# Altium PCB BYTE_Rib.PcbDoc
Units mm, origin at the board's own origin, x right, y up, seen from the top; angles counter-clockwise.
Board outline 38.01 x 73.01 mm, 2 copper layers (Top Layer, Bottom Layer); 29 components, 17 nets, 110 pads, 93 vias.
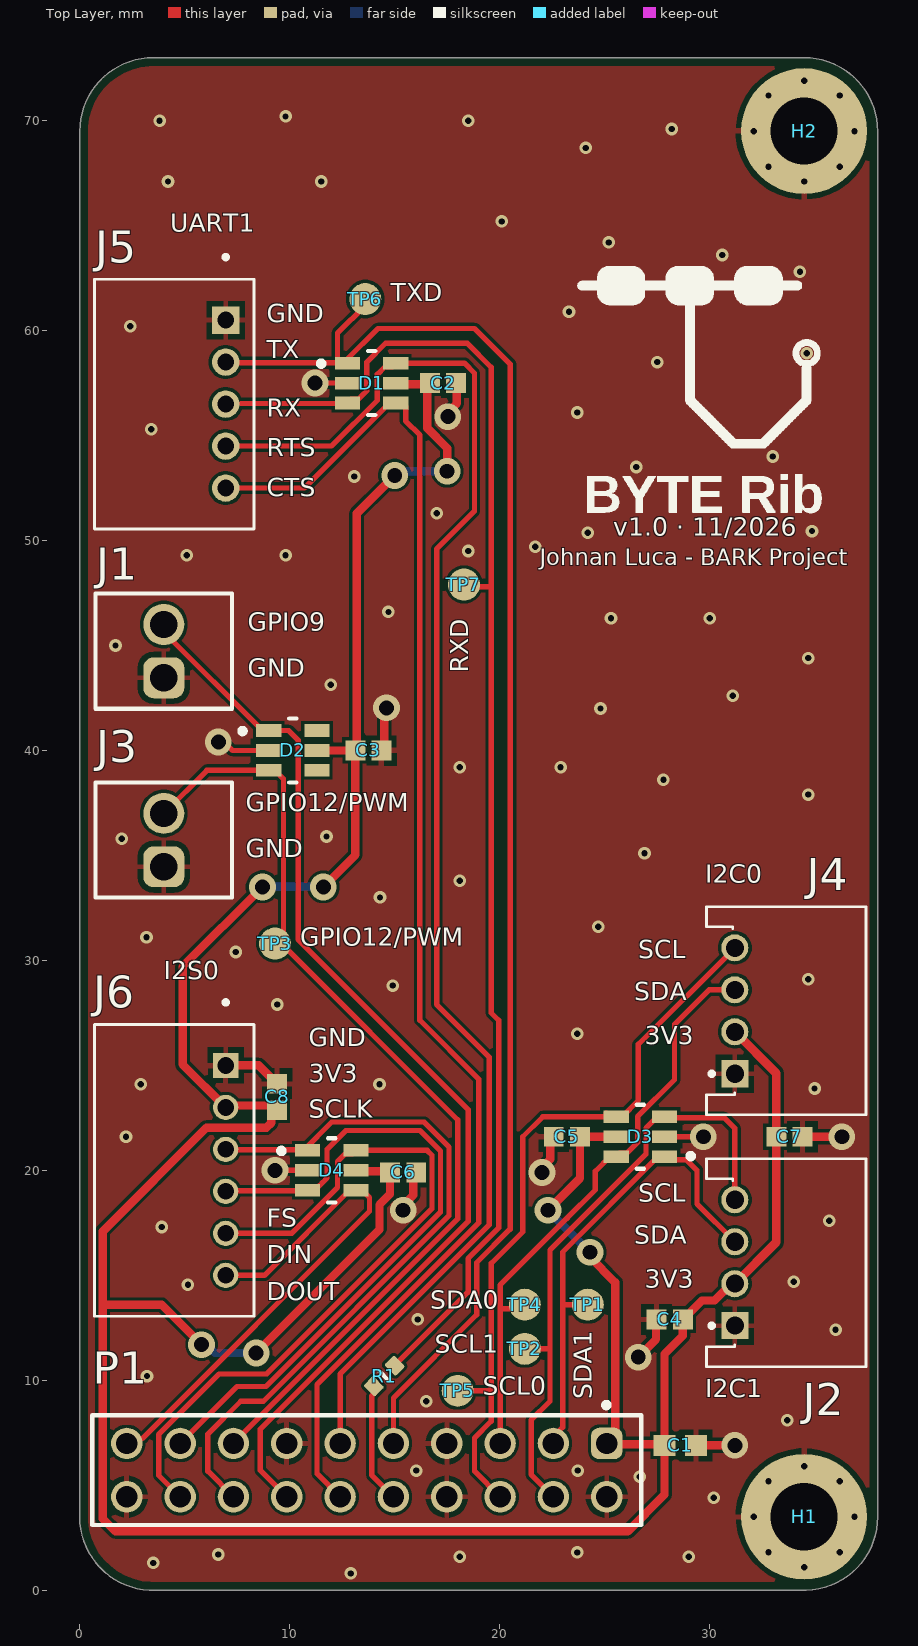
[diagram p0: Top Layer view]
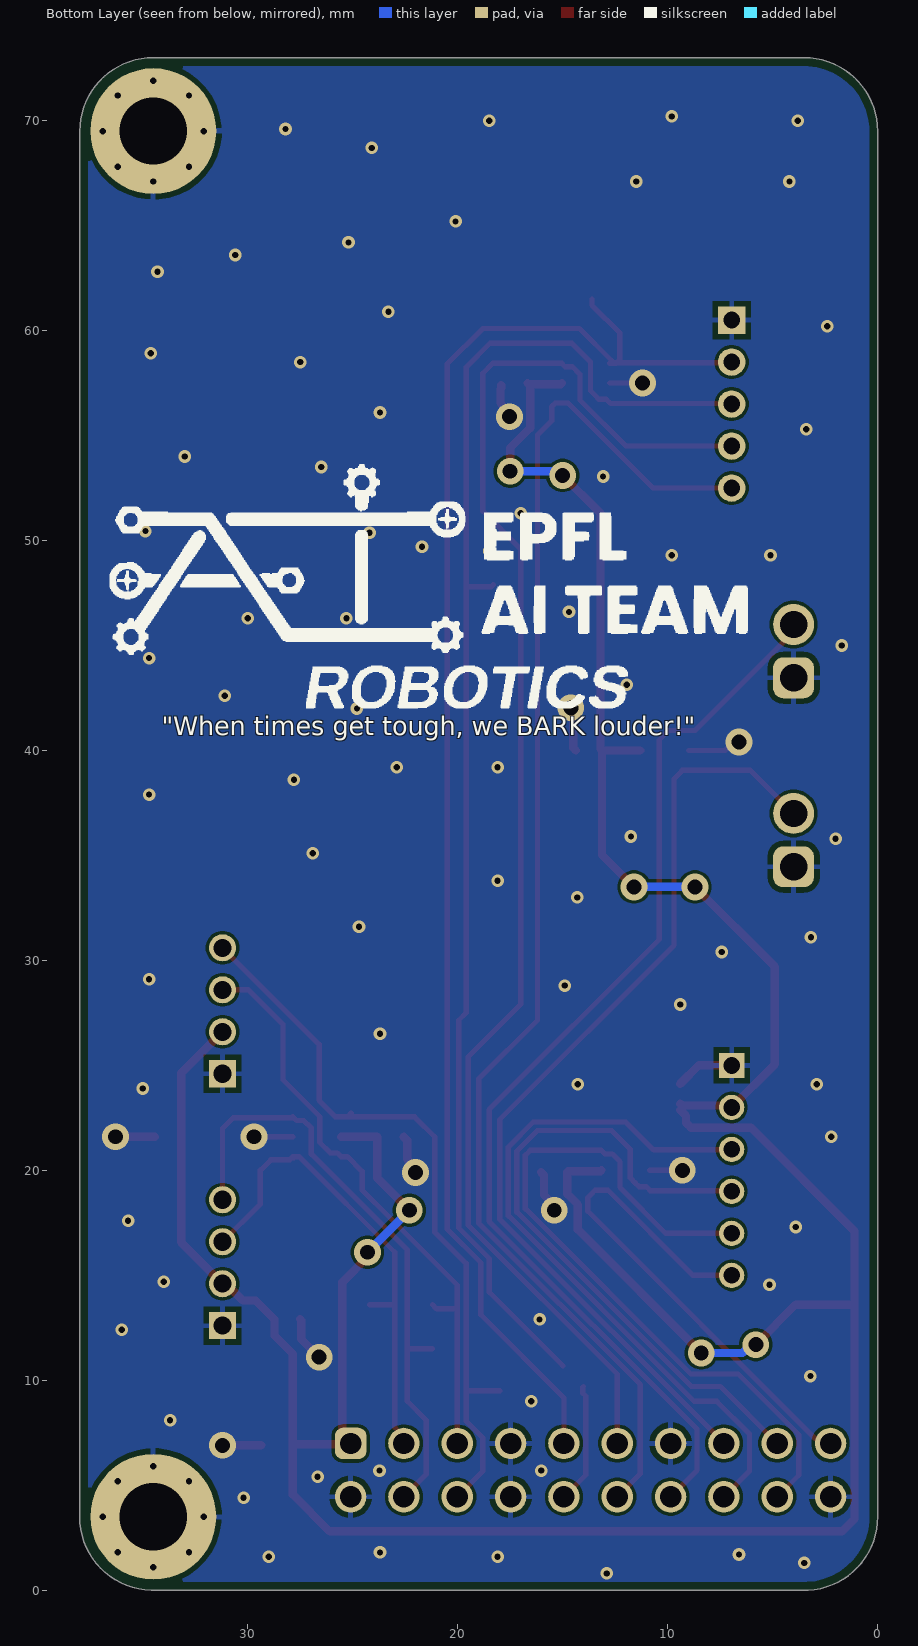
[diagram p1: Bottom Layer view, seen from below]
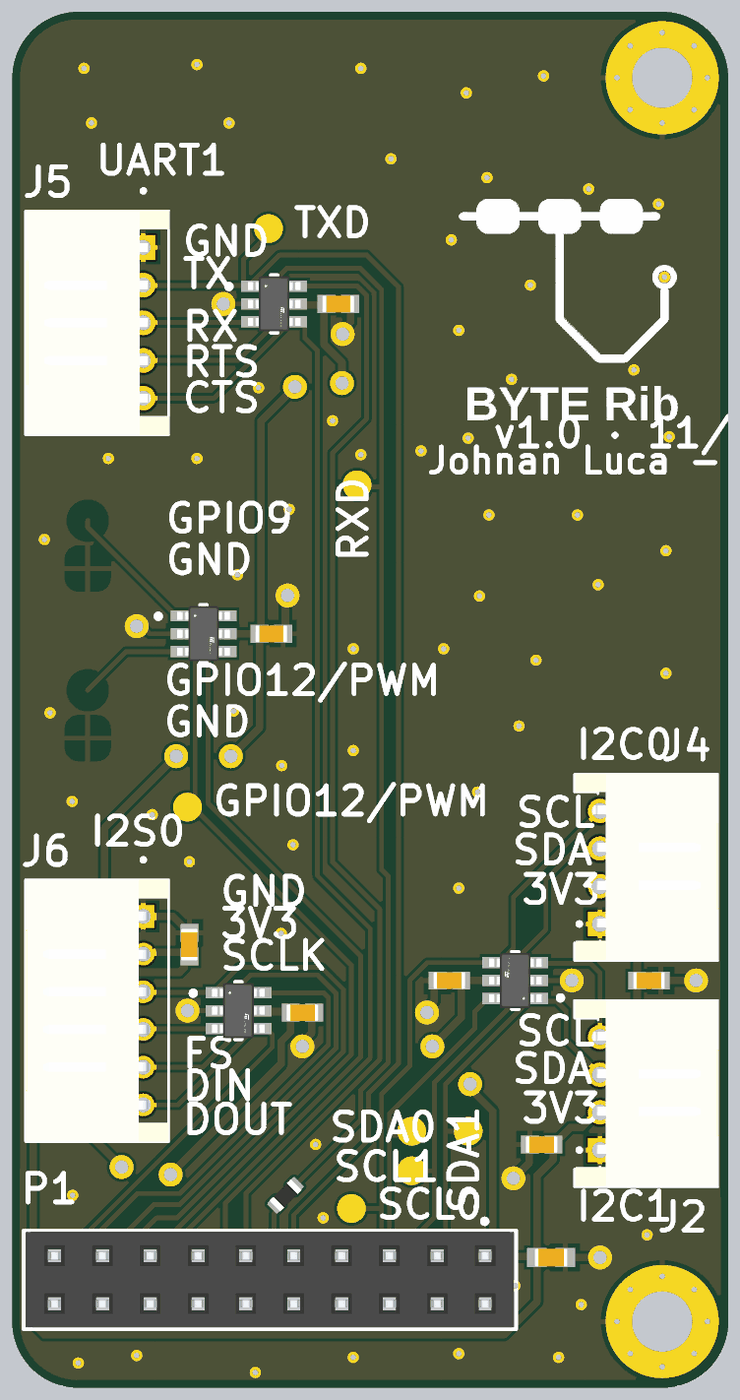
[diagram p2: 3D render of the assembled board from above, using the file's embedded part models]

## Layer stack, top to bottom
Top Solder: solder mask 0.0102, Solder Resist, Dk 3.5
Top Layer: signal copper 0.0356
Dielectric 1: dielectric 0.32, FR-4, Dk 4.8
Bottom Layer: signal copper 0.0356
Bottom Solder: solder mask 0.0102, Solder Resist, Dk 3.5

## Board outline
-0.007,3.5 -0.007,69.493 0,69.5 cw(c3.5,69.5) 3.5,73 34.5,73 cw(c34.5,69.5) 38,69.5 38,3.507 38.007,3.5 cw(c34.5,3.5) 34.6,-0.006 3.602,-0.006 cw(c3.5,3.5)

## Design rules (kind name [scope] priority, off if disabled: settings)
BoardOutlineClearance [All] p1: gap=0.4 ignorepadtopadclearanceinfootprint=FALSE
Clearance [All] p1: gap=0.15 ignorepadtopadclearanceinfootprint=FALSE
PolygonConnect [All] p1: thpad.connectstyle=Relief thpad.reliefconductorwidth=0.254 thpad.reliefentries=4 thpad.polygonreliefangle="90 Angle" thpad.airgapwidth=0.254 smdpad.connectstyle=Relief smdpad.reliefconductorwidth=0.254 smdpad.reliefentries=4 smdpad.polygonreliefangle="90 Angle" smdpad.airgapwidth=0.254 via.connectstyle=Direct via.reliefconductorwidth=0.254 via.reliefentries=4 via.polygonreliefangle="90 Angle" via.airgapwidth=0.254
RoutingVias [All] p1: holewidth=0.8 width=1.27 viastyle="Through Hole" minholewidth=0.3 minwidth=0.6 maxholewidth=0.711 maxwidth=1.3
SolderMaskExpansion [All] p1: expansion=0 istentingtop=FALSE
SupplyNets "Schematic Supply Nets" [InNet('GND')] p1: voltage=0.000
Width Width_PWR [InNet('3V3_Jetson')] p1: maxlimit=0.4 minlimit=0.254 preferedwidth=0.4
Width [All] p2: maxlimit=0.4 minlimit=0.15 preferedwidth=0.254
30 further rules are at their usual default settings.

## Components (designator, comment, footprint, x,y, rotation, side; value= is the part's Value field where it differs from the comment)
C1 "2.2uF" CAPC1608X94X35NL15T15 28.6,6.9 r0 top
C2 "Capacitor 100 nF +/-10% 50 V 0603" CAPC1608X90X40NL10T20 17.3,57.5 r0 top value=100nF
C3 "Capacitor 100 nF +/-10% 50 V 0603" CAPC1608X90X40NL10T20 13.75,40 r0 top value=100nF
C4 "Capacitor 100 nF +/-10% 50 V 0603" CAPC1608X90X40NL10T20 28.1,12.9 r180 top value=100nF
C5 "Capacitor 100 nF +/-10% 50 V 0603" CAPC1608X90X40NL10T20 23.2,21.6 r180 top value=100nF
C6 "Capacitor 100 nF +/-10% 50 V 0603" CAPC1608X90X40NL10T20 15.4,19.9 r0 top value=100nF
C7 "Capacitor 100 nF +/-10% 50 V 0603" CAPC1608X90X40NL10T20 33.8,21.6 r0 top value=100nF
C8 "Capacitor 100 nF +/-10% 50 V 0603" CAPC1608X90X40NL10T20 9.4,23.5 r90 top value=100nF
D1 "USBLC6-4SC6" FP-SOT23-6L-MFG 13.9,57.5 r0 top value=3pF
D2 "USBLC6-4SC6" FP-SOT23-6L-MFG 10.15,40 r0 top value=3pF
D3 "USBLC6-4SC6" FP-SOT23-6L-MFG 26.7,21.6 r180 top value=3pF
D4 "USBLC6-4SC6" FP-SOT23-6L-MFG 12,20 r0 top value=3pF
H1 "M3" MH_M3_PTH 34.5,3.5 r0 top locked
H2 "M3" MH_M3_PTH 34.5,69.5 r0 top locked
J1 "691210910002" 691210910002 -1266,1314.73 r90 top
J2 "S4B-PH-K-S(LF)(SN)" JST_S4B-PH-K-S(LF)(SN) 31.2,15.6 r90 top
J3 "691210910002" 691210910002 -1266,1305.73 r90 top
J4 "S4B-PH-K-S(LF)(SN)" JST_S4B-PH-K-S(LF)(SN) 31.2,27.6 r90 top
J5 "S5B-PH-K-S(LF)(SN)" JST_S5B-PH-K-S(LF)(SN) 4.5,56.5 r270 top
J6 "S6B-PH-K-S(LF)(SN)" JST_S6B-PH-K-S(LF)(SN) 4.5,20 r270 top
P1 "61302021821" 61302021821 13.67,5.72 r180 top locked
R1 "1k" RESC0603(1608)_L 14.5,10.2 r225 top
TP1 "TP" TP_SMD_D1.5 24.2,13.6 r0 top
TP2 "TP" TP_SMD_D1.5 21.2,11.5 r90 top
TP3 "TP" TP_SMD_D1.5 9.3,30.8 r90 top
TP4 "TP" TP_SMD_D1.5 21.2,13.6 r90 top
TP5 "TP" TP_SMD_D1.5 18,9.5 r90 top
TP6 "TP" TP_SMD_D1.5 13.6,61.5 r90 top
TP7 "TP" TP_SMD_D1.5 18.3,47.9 r90 top

## Footprints (in the part's own frame and the unit in brackets; to place one, negate y for a bottom-side part, rotate by r counter-clockwise, add the part's x,y. Pads: shape width x height; smd on the part's side, far side on the other; paste and mask are expansions set on the pad)
61302021821 [mm] "Socket Header, Pitch 2.54 mm, THT, Vertical, dual row, 20p"
  rrect50% 1.5x1.5 hole 1.02: 1(-11.43,-1.27)
  round 1.5 hole 1.02: 2(-11.43,1.27) 3(-8.89,-1.27) 4(-8.89,1.27) 5(-6.35,-1.27) 6(-6.35,1.27) 7(-3.81,-1.27) 8(-3.81,1.27) 9(-1.27,-1.27) 10(-1.27,1.27) 11(1.27,-1.27) 12(1.27,1.27) 13(3.81,-1.27) 14(3.81,1.27) 15(6.35,-1.27) 16(6.35,1.27) 17(8.89,-1.27) 18(8.89,1.27) 19(11.43,-1.27) 20(11.43,1.27)
  silkscreen extent -13.08,-3.22 13.08,2.62, body extent -12.95,-2.54 12.95,2.54, height 8.45
691210910002 [mm] "2,54mm - modular - green - Horizontal wire entry - Cage clamp - 0,8mm2 wires - 02p"
  rrect50% 1.95x1.95 hole 1.3: 1(-1271.27,-1270)
  round 1.95 hole 1.3: 2(-1268.73,-1270)
  silkscreen extent -1272.74,-1273.25 -1267.26,-1266.75, body extent -1272.74,-1273.25 -1267.26,-1266.75, height 8.55
CAPC1608X90X40NL10T20 [mm] "Chip Capacitor, 2-Leads, Body 1.70x0.90mm, IPC Medium Density"
  rect 0.95x0.95 smd: 1(-0.625,0) 2(0.625,0)
  body extent -0.85,-0.45 0.85,0.45, height 0.9
CAPC1608X94X35NL15T15 [mm] "Chip Capacitor, 2-Leads, Body 1.75x0.96mm, IPC Medium Density"
  rect 1.05x1 smd: 1(-0.75,0) 2(0.75,0)
  body extent -0.87,-0.48 0.87,0.48, height 0.94
FP-SOT23-6L-MFG [mm]
  rect 1.2x0.6 smd paste+0 mask+0: 1(-1.15,0.95) 2(-1.15,0) 3(-1.15,-0.95) 4(1.15,-0.95) 5(1.15,0) 6(1.15,0.95)
  silkscreen extent -2.52,-1.53 0.18,1.53, body extent -1.85,-1.63 1.85,1.63, height 0.25
JST_S4B-PH-K-S(LF)(SN) [mm]
  rect 1.29x1.29 / inner round 1.29 / far side rect 1.29x1.29 hole 0.86 mask+0.102: 1(-3,0)
  round 1.29 hole 0.86 mask+0.102: 2(-1,0) 3(1,0) 4(3,0)
  silkscreen extent -4.95,-6.25 4.95,1.35, body extent -4.9,-6.3 5,1.3, height 4.8
JST_S5B-PH-K-S(LF)(SN) [mm]
  rect 1.308x1.308 / inner round 1.308 / far side rect 1.308x1.308 hole 0.8 mask+0.102: 1(-4,2.45)
  round 1.308 hole 0.8 mask+0.102: 2(-2,2.45) 3(0,2.45) 4(2,2.45) 5(4,2.45)
  silkscreen extent -7.1,-3.8 5.95,3.8, body extent -5.95,-3.75 5.95,3.85, height 4.8
JST_S6B-PH-K-S(LF)(SN) [mm]
  rect 1.2x1.2 / inner round 1.2 / far side rect 1.2x1.2 hole 0.8 mask+0.102: 1(-5,2.45)
  round 1.2 hole 0.8 mask+0.102: 2(-3,2.45) 3(-1,2.45) 4(1,2.45) 5(3,2.45) 6(5,2.45)
  silkscreen extent -8.1,-3.8 6.95,3.8, body extent -6.95,-3.8 6.95,3.8, height 4.8
MH_M3_PTH [mm]
  round 0.6 hole 0.3: 1(-2.4,0) 1(-1.697,-1.697) 1(-1.697,1.697) 1(0,-2.4) 1(0,2.4) 1(1.697,-1.697) 1(1.697,1.697) 1(2.4,0)
  round 6 hole 3.2: 1(0,0)
RESC0603(1608)_L [mm] "Chip Resistor, Body 1.6x0.8mm, IPC High Density"
  rrect25% 0.66x0.76 smd: 1(-0.7,0) 2(0.7,0)
  silkscreen extent 0,-0.3 0,0.3, body extent -0.8,-0.4 0.8,0.4, height 0.45
TP_SMD_D1.5 [mil]
  round 60 smd paste-99999: 1(0,0)

## Part data
C1: library part CMP-001-00003-6, Capacitor Type=Ceramic, Case/Package=0603, LCSC=C23630, Max Operating Temperature=125°C, Min Operating Temperature=-55°C, Tolerance=10%, Voltage Rating=16V, Mounting Technology=SM, Pins=2, RoHS Compliant=True
C2 C3 C4 C5 C6 C7 C8: library part CMP-001-00017-6, "Chip Capacitor, 100 nF, +/- 10%, 50 V, 0603 (1608 Metric)", Capacitor Type=Ceramic, Case/Package=0603, LCSC=C14663, Max Operating Temperature=125°C, Min Operating Temperature=-55°C, Tolerance=10%, Voltage Rating=50V, Mounting Technology=SM, Pins=2, RoHS Compliant=True
D1 D2 D3 D4: library part CMP-2000-07370-2, "TVS DIODE 5.25V 17V SOT23-6", Breakdown Voltage=6V, Capacitance=3pF, Clamping Voltage=17V, LCSC=C111212, Manufacturer=STMicroelectronics, Max Junction Temp=+125°C, Package=SOT23-6L, Peak Pulse Power=130W, Temperature="-40°C to +125°C", Temperature Range Low=-40°C, Automotive=No, Category=Diode, ComponentLink2Description=Datasheet, ComponentLink2URL=https://upverter.com/datasheet/23dc4ffb028d868909e80577610284b194f13213.pdf, Device Class L1="Circuit Protection", Device Class L2="ESD and Circuit Protection ICs", Device Class L3=unset, Digikey Description="TVS DIODE 5.25V 17V SOT23-6", Direction=Unidirectional, Height=1.45mm, Interface=USB,Ethernet,Other, Lead Free=Yes, Manufacturer Part Number=USBLC6-4SC6, Mouser Description="USBLC6 Series 4 Line 6 V Uni / Bi-Directional ESD Protection - SOT-23-6", Number Of Channels=4, Octopart=https://octopart.com/usblc6-4sc6-stmicroelectronics-347147, RoHS=TRUE, Standoff Height=0mm, Temperature Range High=+125°C
H1 H2: library part MH_M3_PTH
J1 J3: library part CMP-1502-02456-3, "Tb, Wire To Brd, R/A, 2Way, 18Awg Rohs Compliant: Yes", Current Rating=6A, Max Operating Temperature=105°C, Min Operating Temperature=-40°C, Voltage Rating=150V, Contact Material=Tin, Height=8.7mm, Number of Contacts=2, Number of Rows=1, RoHS=Compliant
J2 J4: library part S4B-PH-K-S_(LF)(SN), "Connector Header Through Hole, Right Angle 4 position 0.079 (2.00mm)", Package="NON STANDARD-4 J.S.T.", Check_prices=https://www.snapeda.com/parts/S4B-PH-K-S%20(LF)(SN)/JST/view-part/?ref=eda, MF="JST Sales", MP="S4B-PH-K-S (LF)(SN)", SnapEDA_Link=https://www.snapeda.com/parts/S4B-PH-K-S%20(LF)(SN)/JST/view-part/?ref=snap
J5: "Connector Header Through Hole, Right Angle 5 position 0.079 (2.00mm)", Package="NON STANDARD-5 J.S.T.", Check_prices=https://www.snapeda.com/parts/S5B-PH-K-S(LF)(SN)/JST/view-part/?ref=eda, MF="JST Sales", MP=S5B-PH-K-S(LF)(SN), SnapEDA_Link=https://www.snapeda.com/parts/S5B-PH-K-S(LF)(SN)/JST/view-part/?ref=snap
J6: "Connector Header Through Hole, Right Angle 6 position 0.079 (2.00mm)", Package="NON STANDARD-6 J.S.T.", Check_prices=https://www.snapeda.com/parts/S6B-PH-K-S(LF)(SN)/JST/view-part/?ref=eda, MF="JST Sales", MP=S6B-PH-K-S(LF)(SN), SnapEDA_Link=https://www.snapeda.com/parts/S6B-PH-K-S(LF)(SN)/JST/view-part/?ref=snap
P1: library part CMP-1502-01350-4, "THT Vertical Socket Header WR-PHD, Pitch 2.54 mm, Dual Row, 20 pins", Contact Resistance=20mΩ, Current Rating=3A, Operating Supply Voltage=250V, Gender=Female, Lead Pitch=2.54mm, Number of Pins=20, Orientation=Vertical
R1: library part CMP-009-00175-3, "0603", LCSC=C21190, Max Operating Temperature=155°C, Min Operating Temperature=-55°C, Case/Package=0603, Pins=2
TP1 TP2 TP3 TP4 TP5 TP6 TP7: library part TP_SMD_D1.5

## Via types
v1: diameter 0.6, hole 0.3, Top Layer to Bottom Layer, 74 vias
v2: diameter 1.27, hole 0.711, Top Layer to Bottom Layer, 19 vias

## Nets (pads, with @x,y where several pads share a name; then routed paths per layer and width w, separated by ;. In a path a pad name is that pad's centre, name@x,y a point inside that pad or via, vN(x,y) a via of type N, cw(c..) or ccw(c..) an arc to the next point about the centre after c; other vN are vias at no path point)
3V3_Jetson: C1.1 C2.1 C3.1 C4.1 C5.1 C6.1 C7.1 C8.1 D1.5 D2.5 D3.5 D4.5 J2.2 J4.2 J6.2 P1.1 | length 170.2
  Top Layer w0.4: v2(5.8,11.7) 3.9,13.6 1.1,13.6 ; v2(8.4,11.3) 14.277,17.177 14.277,18.37 14.775,18.868 C6.1 14.725,19.95 13.2,19.95 D4.5 ; v2(8.7,33.5) 4.9,29.7 4.9,25.05 J6.2 7.038,23.088 9.313,23.088 C8.1@9.4,23.175 ; C8.1 9.125,22.6 9.125,22.269 8.891,22.034 6.034,22.034 1.1,17.1 1.1,13.6 ; D2.5 C3.1 ; v2(11.6,33.5) 13.125,35.025 C3.1 ; v2(15,53.1) 13.2,51.3 13.2,40.075 C3.1 ; D1.5 15.1,57.45 C2.1@16.625,57.45 ; C2.1 16.549,57.374 16.549,55.351 17.5,54.4 v2(17.5,53.3) ; v2(22.3,18.1) 23.825,19.625 C5.1 D3.5 ; v2(24.3,16.1) 24.3,15.865 25.5,14.665 25.5,7.39 P1.1 25.145,6.945 27.805,6.945 C1.1 ; J4.2 33.175,24.625 C7.1 33.175,16.575 J2.2 31.035,14.6 30.237,13.802 29.627,13.802 C4.1 28.725,12.125 27.85,11.25 C1.1 ; 1.1,13.6 1.1,3.4 1.7,2.8 26.1,2.8 27.85,4.55 C1.1
  Bottom Layer w0.4: v2(5.8,11.7) 6.035,11.7 6.435,11.3 v2(8.4,11.3) ; v2(8.7,33.5) v2(11.6,33.5) ; v2(15,53.1) 15.2,53.3 v2(17.5,53.3) ; v2(22.3,18.1) v2(24.3,16.1)
GND: C1.2 C2.2 C3.2 C4.2 C5.2 C6.2 C7.2 C8.2 D1.2 D2.2 D3.2 D4.2 H1.1 H2.1 J1.1 J2.1 J3.1 J4.1 J5.1 J6.1 P1.2 P1.7 P1.8 P1.13 P1.20 | length 24
  Top Layer w0.254: v2(6.6,40.4) 6.875,40.4 7.275,40 D2.2 ; v2(9.3,20) D4.2 ; v2(11.2,57.5) D1.2 ; D3.2 v2(29.7,21.6)
  Top Layer w0.4: J6.1 8.525,25 C8.2 ; C3.2 14.492,40.117 14.492,41.912 v2(14.61,42.029) ; v2(15.4,18.1) 15.4,18.335 15.89,18.825 15.89,19.765 C6.2 ; v2(17.534,55.9) 17.534,56.108 17.963,56.536 17.963,57.225 17.925,57.262 C2.2@17.925,57.4 ; v2(22.012,19.9) 22.012,20.135 22.402,20.525 22.402,21.427 C5.2 ; v2(26.6,11.1) 27.445,11.945 27.445,12.85 C4.2@27.495,12.9 ; C1.2 v2(31.2,6.9) ; C7.2 v2(36.3,21.6)
  other v1: 12.9,0.8 3.5,1.3 18.1,1.6 29,1.6 6.6,1.7 23.7,1.8 30.2,4.4 26.675,5.4 16.025,5.7 23.725,5.7 33.7,8.1 16.5,9 3.2,10.2 36,12.4 16.1,12.9 5.15,14.55 34,14.7 3.9,17.3 35.7,17.6 2.2,21.6 35,23.9 2.9,24.1 14.275,24.1 23.7,26.5 9.4,27.9 14.9,28.8 34.7,29.1 7.425,30.4 3.175,31.1 24.7,31.6 14.3,33 18.1,33.8 26.9,35.1 2,35.8 11.75,35.9 34.7,37.9 27.8,38.6 18.1,39.2 22.9,39.2 24.8,42 31.1,42.6 11.95,43.125 34.7,44.4 1.7,45 25.3,46.3 30,46.3 14.7,46.6 5.1,49.3 9.8,49.3 18.5,49.5 21.7,49.7 24.2,50.375 34.875,50.45 17,51.3 13.075,53.05 26.5,53.5 33,54 3.4,55.3 23.7,56.1 27.5,58.5 34.625,58.925 2.4,60.2 23.3,60.9 34.3,62.8 30.6,63.6 25.2,64.2 20.1,65.2 4.2,67.1 11.5,67.1 24.1,68.7 28.2,69.6 3.8,70 18.5,70 9.8,70.2
GPIO9: D2.1 J1.2 P1.14 | length 52.9
  Top Layer w0.254: J1.2 4,45.65 8.7,40.95 D2.1 9.95,40.95 10.4,40.5 10.4,31 18.5,22.9 18.5,17.571 8.6,7.671 8.6,5.71 P1.14
GPIO12/PWM: D2.3 J3.2 P1.15 TP3.1 | length 46.2
  Top Layer w0.254: J3.2 6.05,39.05 D2.3 9.3,39.05 9.7,38.65 9.7,30.71 18,22.41 18,17.686 7.32,7.006 P1.15
I2C0_SCL: D3.4 J4.4 P1.6 TP5.1 | length 35.8
  Top Layer w0.254: TP5.1 19.6,9.5 ; P1.6 18.8,5.67 18.8,7.255 19.6,8.055 19.6,9.5 ; D3.4@25.077,22.723 D3.4@25.25,22.55 ; J4.4 26.6,26 26.6,23.323 25.827,22.55 D3.4 D3.4@25.25,22.55 ; 19.6,9.5 19.6,15.571 21.1,17.071 21.1,21.6 22.05,22.55 D3.4@25.25,22.55
I2C0_SDA: D3.6 J4.3 P1.5 TP4.1 | length 28.6
  Top Layer w0.254: P1.5 20.02,13.4 ; TP4.1 21,13.4 20.02,13.4 ; J4.3 29.969,28.6 28.323,26.954 28.323,24.315 26.569,22.561 26.569,21.327 26.065,20.823 25.723,20.823 D3.6 25.25,20.65 24.55,19.95 24.55,19.06 23.212,17.722 20.02,14.53 20.02,13.4
I2C1_SCL: D3.3 J2.4 P1.4 TP2.1 | length 29.5
  Top Layer w0.254: TP2.1 22.4,11.5 ; P1.4 21.5,5.51 21.5,8.1 22.4,9 22.4,11.5 ; J2.4 31.2,22 30.688,22.512 27.888,22.512 D3.3 27.677,22.377 27.335,22.377 26.973,22.015 26.973,20.773 22.4,16.2 22.4,11.5
I2C1_SDA: D3.1 J2.3 P1.3 TP1.1 | length 23.3
  Top Layer w0.254: P1.3 22.56,7.322 23,7.762 23,13.6 ; TP1.1 23,13.6 ; D3.1@27.8,20.6 D3.1 ; J2.3 29.4,18.4 29.4,20 28.9,20.5 28,20.5 D3.1 ; 23,13.6 23,16.1 27.55,20.65 D3.1
I2S0_DIN: D4.6 J6.5 P1.18 | length 35.7
  Top Layer w0.254: P1.18 3.753,5.477 3.753,7.415 6.638,10.3 8.9,10.3 16.777,18.177 16.777,20.717 16.544,20.95 D4.6 12.977,20.777 12.635,20.777 12.273,20.415 12.273,19.181 10.092,17 J6.5
I2S0_DOUT: D4.4 J6.6 P1.19 | length 25.5
  Top Layer w0.254: P1.19 2.478,7.228 2.978,7.228 13.8,18.05 13.8,18.7 13.623,18.877 13.45,19.05 12.85,19.05 8.8,15 J6.6
I2S0_FS: D4.3 J6.4 P1.17 | length 32.5
  Top Layer w0.254: P1.17 7.49,9.7 8.871,9.7 17.181,18.01 17.181,20.919 16.204,21.896 12.67,21.896 11.774,21 11.774,19.632 11.547,19.406 11.365,19.223 11.023,19.223 D4.3 10.825,19.025 6.975,19.025 J6.4
I2S0_SCLK: D4.1 J6.3 P1.16 | length 34.2
  Top Layer w0.254: J6.3 6.975,20.975 10.675,20.975 12,22.3 16.4,22.3 17.585,21.115 17.585,17.842 8.743,9 7.665,9 6.1,7.435 6.1,5.67 P1.16
UART1_CTS: D1.4 J5.5 P1.12 | length 66.6
  Top Layer w0.254: 7.65,52.5 10.7,52.5 14.75,56.55 15.35,56.55 15.523,56.377 15.523,55.702 16.2,55.025 16.2,27.9 16.2,27.149 19,24.349 19,17.5 11.3,9.8 11.3,5.55 P1.12
UART1_RTS: D1.6 J5.4 P1.11 | length 69.4
  Top Layer w0.254: 7.65,54.5 11.992,54.5 14.173,56.681 14.173,57.915 14.535,58.277 14.877,58.277 D1.6 18.317,58.45 18.8,57.967 18.8,51.4 17,49.6 17,27.9 19.5,25.4 19.5,17.4 12.4,10.3 P1.11
UART1_RXD: P1.10 R1.2 | length 5.8
  Top Layer w0.254: R1.2 14.04,9.67 14.04,9.382 13.9,9.242 13.9,5.49 P1.10
UART1_RXD_EXT: D1.3 J5.3 R1.1 TP7.1 | length 65.5
  Top Layer w0.254: J5.3 J5.3@6.975,56.525 ; 7.675,56.525 12.725,56.525 12.923,56.723 13.265,56.723 13.447,56.906 13.674,57.132 13.674,58.5 14.574,59.4 18.45,59.4 19.6,58.25 19.6,47.8 ; R1.1 18.496,14.196 18.496,15.796 19.95,17.25 19.95,27.15 19.6,27.5 19.6,47.8 ; TP7.1 18.4,47.8 19.6,47.8
UART1_TXD: D1.1 J5.2 P1.9 TP6.1 | length 72.7
  Top Layer w0.254: J5.2 6.975,58.475 12.725,58.475 D1.1 12.45,58.45 12.277,58.623 12.277,59.879 13.6,61.202 TP6.1 ; D1.1@12.664,58.564 14.2,60.1 18.8,60.1 20.5,58.4 20.5,17.2 18.9,15.6 18.9,13.12 14.94,9.16 P1.9
pads on no net: D2.4 D2.6

## Polygon pours and split planes (outlines as drawn)
GND on Bottom Layer "GND_L02_P001" (solid, remove dead copper, pour order 1): 0,73 0,0 38,0 38,73
GND on Top Layer "GND_L01_P000" (solid, remove dead copper, pour order 0): 0,73 0,0 38,0 38,73

## Silkscreen, mask and mechanical layers (free items; w line width, h text height)
Top Overlay:
  drawing of 9 lines, arcs and shapes, not listed
  text "UART1" at 4.3,64.418 h1.5
  text "TXD" at 14.8,61.1 h1.5
  text "GND" at 8.9,60.118 h1.5
  text "TX" at 8.9,58.4 h1.5
  text "RX" at 8.9,55.6 h1.5
  text "RTS" at 8.9,53.718 h1.5
  text "CTS" at 8.9,51.818 h1.5
  text "v1.0 · 11/2026" at 25.4,49.943 h1.5
  text "Johnan Luca - BARK Project" at 21.898,48.554 h1.35
  text "GPIO9" at 8,45.418 h1.5
  text "RXD" at 18.8,43.7 h1.5 r90
  text "GND" at 8,43.218 h1.5
  text "GPIO12/PWM" at 7.9,36.818 h1.5
  text "GND" at 7.9,34.618 h1.5
  text "I2C0" at 29.8,33.418 h1.5
  text "GPIO12/PWM" at 10.5,30.418 h1.5
  text "SCL" at 26.6,29.818 h1.5
  text "I2S0" at 4,28.818 h1.5
  text "SDA" at 26.4,27.818 h1.5
  text "3V3" at 26.9,25.718 h1.5
  text "GND" at 10.9,25.618 h1.5
  text "3V3" at 10.9,23.918 h1.5
  text "SCLK" at 10.9,22.218 h1.5
  text "SCL" at 26.6,18.218 h1.5
  text "FS" at 8.9,17.018 h1.5
  text "SDA" at 26.4,16.218 h1.5
  text "DIN" at 8.9,15.3 h1.5
  text "3V3" at 26.9,14.118 h1.5
  text "DOUT" at 8.9,13.518 h1.5
  text "SDA0" at 16.7,13.118 h1.5
  text "SCL1" at 16.9,11.018 h1.5
  text "SDA1" at 24.682,9.1 h1.5 r90
  text "SCL0" at 19.2,9.018 h1.5
  text "I2C1" at 29.8,8.917 h1.5
Bottom Overlay:
  drawing of 26 lines, arcs and shapes, not listed
  text "\"When times get tough, we BARK louder!\"" at 34.1,40.407 h1.52
Mechanical 1:
  lines w0.254: -0.007,69.493 -0.007,3.5 ccw(c3.5,3.5) 3.602,-0.006 34.6,-0.006 ccw(c34.5,3.5) 38.007,3.5 ; 0,69.5 cw(c3.5,69.5) 3.5,73 34.5,73 cw(c34.5,69.5) 38,69.5 38,3.507